# Altium PCB ResearchProject_V5.PcbDoc (part 2 of 2)
Units mm, origin at the board's own origin, x right, y up, seen from the top; angles counter-clockwise.
Board outline 152.49 x 130.17 mm, 4 copper layers (Top Layer, GND, 3V3, Bottom Layer), stack 0.603 mm thick; 150 components, 186 nets, 766 pads, 209 vias.
Unrouted connection lines stored in the file: 6.
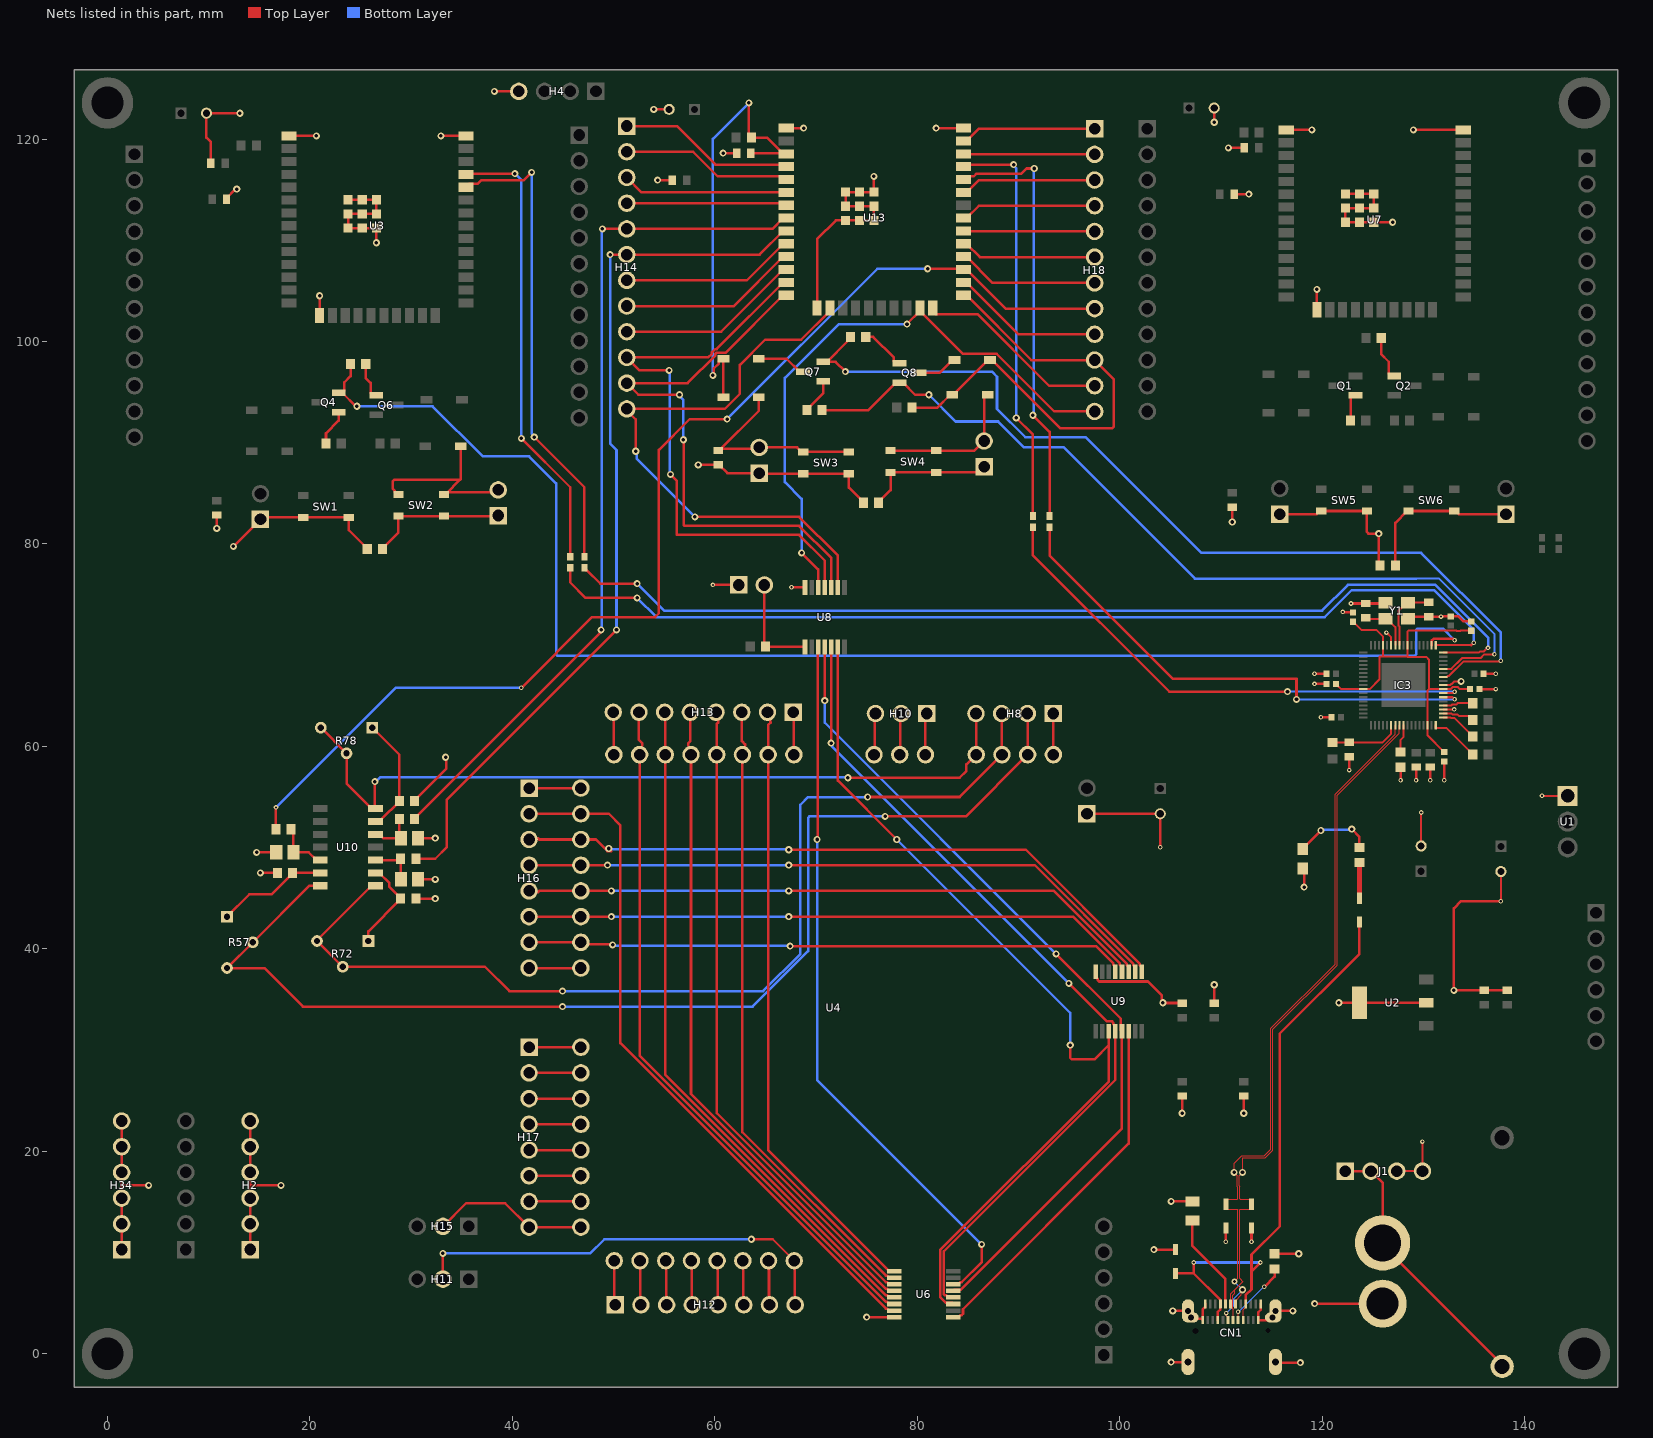
[diagram p4: the nets of this part, all layers, seen from the top]

## Via types
v1: diameter 0.7, hole 0.35, Top Layer to Bottom Layer, tented both sides, 161 vias
v2: diameter 0.45, hole 0.225, Top Layer to Bottom Layer, tented both sides, 45 vias
v3: diameter 0.45, hole 0.225, Top Layer to Bottom Layer, 1 vias
v4: diameter 0.7, hole 0.225, Top Layer to Bottom Layer, tented both sides, 1 vias
v5: diameter 0.6, hole 0.3, Top Layer to Bottom Layer, tented both sides, 1 vias

## Nets (pads, with @x,y where several pads share a name; then routed paths per layer and width w, separated by ;. In a path a pad name is that pad's centre, name@x,y a point inside that pad or via, vN(x,y) a via of type N, cw(c..) or ccw(c..) an arc to the next point about the centre after c; other vN are vias at no path point) (continued)
CLIENT_IO0_KEY: D16.1 H20.2 SW2.3 SW2.4 | length 19.5
  Top Layer w0.25: SW2.4@28.738,84.895 28.588,84.895 28.363,85.12 28.363,85.27 28.194,85.439 28.194,86.214 28.34,86.36 34.853,86.36 34.897,86.404 ; D16.1@34.897,89.662 34.897,86.404 ; H20.2@38.608,85.344 38.383,85.119 33.463,85.119 SW2.3@33.238,84.895 33.388,84.895 34.897,86.404
CLIENT_RTS: IC3.19 Q4.2 R51.1 | length 140
  Top Layer w0.25: Q4.2@22.844,94.94 Q4.2@23.194,94.94 ; R51.1@24.015,97.79 24.015,96.588 23.394,95.967 23.394,95.14 Q4.2@23.194,94.94 ; v1(24.638,93.599) 24.535,93.599 Q4.2@23.194,94.94 ; IC3.19@130.835,70.003 130.86,70.028 130.86,70.473 131.041,70.655 132.872,70.655 133.042,70.485 v2(133.096,70.485)
  Bottom Layer w0.25: v1(24.638,93.599) 32.131,93.599 37.084,88.646 41.656,88.646 44.323,85.979 44.323,69.087 44.469,68.94 129.14,68.94 129.286,69.087 129.286,71.482 129.432,71.628 131.953,71.628 v2(133.096,70.485)
CLIENT_RXD: IC3.18 R19.1 | length 100
  Top Layer w0.2: IC3.18@131.235,70.003 134.719,70.003
  Top Layer w0.25: R19.1@45.72,77.64 45.72,76.2 47.244,74.676 v1(52.324,74.676) ; 134.719,70.003 134.947,70.231 v2(135.001,70.231)
  Bottom Layer w0.25: v1(52.324,74.676) 54.229,72.771 120.269,72.771 122.936,75.438 131.064,75.438 135.001,71.501 v2(135.001,70.231)
CLIENT_TXD: IC3.17 R18.1 | length 99.9
  Top Layer w0.2: IC3.17@131.985,69.253 135.479,69.253 135.619,69.392 136,69.392 136.33,69.723 v2(136.398,69.723)
  Top Layer w0.25: R18.1@47.117,77.64 47.117,77.565 47.292,77.39 47.367,77.39 48.684,76.073 v1(52.324,76.073)
  Bottom Layer w0.25: v1(52.324,76.073) 54.991,73.406 120.015,73.406 122.555,75.946 131.191,75.946 136.398,70.739 v2(136.398,69.723)
CLIENT_U0RXD: R18.2 U3.34 | length 47.2
  Top Layer w0.25: U3.34@35.42,115.242 35.745,115.567 36.573,115.567 36.957,115.951 41.148,115.951 v1(41.91,116.713) ; v1(42.164,90.551) 47.117,85.598 R18.2@47.117,78.74
  Bottom Layer w0.25: v1(41.91,116.713) 41.91,90.927 42.164,90.673 v1(42.164,90.551)
CLIENT_U0TXD: R19.2 U3.35 | length 45
  Top Layer w0.25: U3.35@35.42,116.512 35.494,116.586 v1(40.259,116.586) ; v1(40.894,90.424) 45.72,85.598 R19.2@45.72,78.74
  Bottom Layer w0.25: v1(40.259,116.586) 40.894,115.951 v1(40.894,90.424)
GND: C1.2 C2.2 C3.2 C4.2 C5.2 C6.2 C7.2 C8.2 C9.2 C10.2 C11.2 C12.1 C16.2 C17.2 C25.2 C26.2 C27.2 C28.2 C29.2 C32.2 C35.1 C36.2 C37.2 C38.2 C39.2 C43.2 C45.1 C46.2 C49.2 C50.2 C51.2 C52.2 C59.2 C60.2 C61.2 C62.2 C63.2 C64.2 CN1.1 CN1.2 CN1.3 CN1.4 CN1.A1 CN1.A12 CN1.B1 CN1.B12 D8.1 D9.1 D10.1 D13.1 H2.1 H2.2 H2.3 H2.4 H2.5 H2.6 H4.4 H6.1 H19.1 H21.1 H22.1 H34.1 H34.2 H34.3 H34.4 H34.5 H34.6 IC3.3 IC3.9 IC3.29 J1.3 J1.4 J2.2 R5.2 R38.2 R50.2 R56.1 R65.2 R70.1 R77.1 R81.2 R88.2 SW1.1 SW1.2 SW3.1 SW3.2 SW5.1 SW5.2 U1.1 U2.2 U2.4 U3.1 U3.15 U3.38 U3.39 U3.40 U3.41 U3.42 U3.43 U3.44 U3.45 U3.46 U3.47 U4.1 U6.8 U7.1 U7.15 U7.38 U7.39 U7.40 U7.41 U7.42 U7.43 U7.44 U7.45 U7.46 U7.47 U8.7 U9.8 U13.1 U13.15 U13.38 U13.39 U13.40 U13.41 U13.42 U13.43 U13.44 U13.45 U13.46 U13.47 Y1.2 Y1.4 | length 325
  Top Layer w0.2: v2(126.365,71.247) 126.835,70.777 IC3.29@126.835,70.003 ; J1.3@127.381,18.034 J1.4@129.921,18.034 v3(129.921,20.955) ; C3.2@129.794,50.165 v2(129.794,53.467) ; IC3.3@131.985,63.653 v2(133.07,63.653) ; IC3.9@131.985,66.053 132.663,66.053 132.78,66.169 132.836,66.169 133.088,66.421 v1(133.731,66.421) ; v2(137.668,44.704) C2.2@137.668,47.625 ; v2(141.732,55.118) U1.1@144.272,55.118
  Top Layer w0.25: H34.1@1.397,10.287 H34.2@1.397,12.827 H34.3@1.397,15.367 1.397,16.625 ; H34.4@1.397,17.895 1.397,16.625 ; H34.4@1.397,17.907 H34.5@1.397,20.447 H34.6@1.397,22.987 ; v1(4.064,16.625) 1.397,16.625 ; C16.2@10.212,117.602 10.212,119.718 9.779,120.151 C8.2@9.779,122.555 v1(13.081,122.555) ; v1(10.795,81.534) C35.1@10.795,82.856 ; C9.2@11.759,114.046 11.759,114.151 12.67,115.062 v1(12.775,115.062) ; v1(12.446,79.756) H19.1@15.113,82.423 15.308,82.618 SW1.2@19.34,82.618 SW1.1@23.84,82.618 23.84,81.378 25.666,79.552 R50.2@25.666,79.502 ; H2.1@14.097,10.287 H2.2@14.097,12.827 H2.3@14.097,15.367 14.097,16.625 ; H2.4@14.097,17.895 14.097,16.625 ; H2.4@14.097,17.907 H2.5@14.097,20.447 H2.6@14.097,22.987 ; v1(14.732,49.53) C43.2@16.676,49.53 ; v1(15.113,47.498) R56.1@16.788,47.498 ; v1(17.145,16.625) 14.097,16.625 ; U3.1@17.92,120.322 v1(20.648,120.322) ; U3.15@20.955,102.562 v1(20.955,104.521) ; U3.39@23.77,114.002 U3.46@25.17,114.002 U3.45@26.57,114.002 U3.44@26.57,112.602 U3.47@25.17,112.602 U3.40@23.77,112.602 U3.41@23.77,111.202 U3.42@25.17,111.202 U3.43@26.57,111.202 v1(26.57,109.755) ; R77.1@30.341,54.61 30.341,54.66 33.466,57.785 33.466,58.863 v1(33.401,58.928) ; R70.1@30.468,44.958 v1(32.385,44.958) ; C46.2@30.695,46.863 v1(32.385,46.863) ; C49.2@30.695,50.927 v1(32.385,50.927) ; v1(32.946,120.322) U3.38@35.42,120.322 ; v1(38.227,124.714) H4.4@40.64,124.714 ; v1(53.975,122.936) C50.2@55.499,122.936 ; v1(54.356,115.951) C51.2@55.805,115.951 ; v1(58.368,87.809) C45.1@60.325,87.809 ; v2(59.817,75.946) H21.1@62.357,75.946 ; C45.1@60.43,87.809 61.244,86.995 H22.1@64.389,86.995 64.448,86.936 SW3.2@68.743,86.936 SW3.1@73.243,86.936 73.243,85.569 74.688,84.124 R65.2@74.688,84.074 ; v1(60.833,118.618) C52.2@62.155,118.618 ; U13.1@67.069,121.084 v1(68.781,121.084) ; v2(67.581,75.709) U8.7@68.916,75.709 ; U13.15@70.104,103.324 70.104,110.109 71.959,111.964 U13.41@72.919,111.964 U13.42@74.319,111.964 U13.43@75.719,111.964 U13.44@75.719,113.364 U13.47@74.319,113.364 U13.40@72.919,113.364 U13.39@72.919,114.764 U13.46@74.319,114.764 U13.45@75.719,114.764 v1(75.719,116.305) ; v1(75.005,3.608) U6.8@77.724,3.608 ; v1(81.862,121.084) U13.38@84.569,121.084 ; U4.1@96.774,53.339 C17.2@104.013,53.34 v2(104.013,50.038) ; U9.8@97.633,37.719 97.633,37.219 97.831,37.021 97.831,36.9 97.964,36.767 102.806,36.767 104.181,35.392 104.181,34.757 v1(104.267,34.671) 104.293,34.645 106.146,34.645 C32.2@106.172,34.619 ; v1(103.378,10.287) D10.1@105.537,10.287 ; v1(105.09,15.047) R88.2@107.188,15.047 ; v1(105.096,-0.829) CN1.3@106.761,-0.829 ; v1(105.253,4.221) CN1.1@106.761,4.221 ; v1(106.172,23.749) C7.2@106.172,25.452 ; CN1.1@107.061,3.571 107.186,3.446 108.196,3.446 108.206,3.436 CN1.B12@108.206,3.321 108.206,4.356 108.456,4.606 CN1.A1@108.456,4.921 ; C37.2@109.347,34.619 v1(109.347,36.449) ; v1(109.347,121.666) C1.2@109.347,123.063 ; v2(110.49,11.049) D9.1@110.49,12.414 ; v1(110.744,119.126) C10.2@112.32,119.126 ; v1(111.125,82.169) C12.1@111.125,83.618 ; C11.2@111.327,114.554 v1(112.776,114.554) ; v1(112.268,23.749) C5.2@112.268,25.452 ; v2(113.03,11.049) D8.1@113.03,12.414 ; CN1.A12@113.956,4.921 113.946,4.911 113.946,4.336 113.706,4.096 CN1.B1@113.706,3.321 114.794,3.321 115.401,3.928 CN1.2@115.401,4.221 v1(117.124,4.221) ; R81.2@115.316,9.875 v1(117.698,9.875) ; CN1.4@115.401,-0.829 115.461,-0.889 v1(117.856,-0.889) ; H6.1@115.824,82.931 119.452,82.931 119.774,83.253 SW5.2@119.924,83.253 SW5.1@124.424,83.253 124.424,81.189 124.587,81.026 v1(125.603,81.026) 125.603,77.99 R5.2@125.742,77.851 ; U7.1@116.459,120.904 v1(118.999,120.904) ; D13.1@118.11,47.945 118.237,47.818 v1(118.237,46.101) ; v2(119.253,66.167) C64.2@120.444,66.167 ; v2(119.253,67.183) C27.2@120.444,67.183 ; v1(119.266,4.94) J2.2@125.984,4.94 ; U7.15@119.494,103.144 v1(119.494,105.143) ; v2(119.888,62.865) C28.2@120.952,62.865 ; v1(121.666,34.671) U2.4@123.7,34.671 U2.2@130.3,34.671 ; v2(122.047,73.279) 122.095,73.231 C36.2@123.063,73.231 ; U7.39@122.309,114.584 U7.46@123.709,114.584 U7.45@125.109,114.584 U7.44@125.109,113.184 U7.47@123.709,113.184 U7.40@122.309,113.184 U7.41@122.309,111.784 U7.42@123.709,111.784 U7.43@125.109,111.784 v1(126.976,111.784) ; v2(122.682,57.658) C25.2@122.682,58.98 ; v2(122.861,74.116) C60.2@124.333,74.116 126.191,74.116 Y1.2@126.281,74.206 ; v2(127.762,56.642) R38.2@127.762,57.936 ; Y1.4@128.481,72.606 128.698,72.823 C59.2@130.556,72.823 v2(131.751,72.823) 131.764,72.836 132.701,72.836 C26.2@132.715,72.85 133.467,72.85 133.975,72.342 C63.2@134.747,72.342 ; v1(129.032,120.904) U7.38@133.959,120.904 ; v2(129.286,56.642) C39.2@129.286,57.964 ; v2(130.683,56.642) C38.2@130.683,57.964 ; v2(132.08,56.642) C61.2@132.08,58.516 ; C62.2@135.54,65.659 v2(137.16,65.659) ; C29.2@135.969,67.183 v2(137.16,67.183) ; v2(137.668,44.704) 133.731,44.704 133.021,43.994 v1(133.021,35.889) C4.2@136.017,35.889 C6.2@138.303,35.889
NetC25_1: C25.1 FB2.2 IC3.57 | length 7
  Top Layer w0.2: FB2.2@121.031,60.363 121.068,60.4 C25.1@122.682,60.4 125.983,60.4 126.835,61.252 IC3.57@126.835,62.103
NetC43_1: C43.1 R54.2 U10.5 | length 5.3
  Top Layer w0.25: R54.2@18.149,51.816 18.376,51.589 C43.1@18.376,49.53 19.887,49.53 20.649,48.768 U10.5@21.03,48.768
NetC46_1: C46.1 R68.2 U10.10 | length 4.6
  Top Layer w0.25: U10.10@26.468,48.768 28.841,48.768 R68.2@28.968,48.895 28.995,48.868 C46.1@28.995,46.863
NetC49_1: C49.1 R75.2 U10.12 | length 4.7
  Top Layer w0.25: U10.12@26.468,51.308 26.849,51.308 27.23,50.927 C49.1@28.995,50.927 28.841,51.081 R75.2@28.841,52.832
NetC59_1: C59.1 IC3.27 Y1.1 | length 6.8
  Top Layer w0.2: IC3.27@127.635,70.003 127.635,71.857 127.554,71.937 127.554,73.404 128.356,74.206 Y1.1@128.481,74.206 130.519,74.206 C59.1@130.556,74.243
NetC60_1: C60.1 IC3.28 Y1.3 | length 5.1
  Top Layer w0.2: C60.1@124.333,72.696 124.423,72.606 Y1.3@126.281,72.606 126.406,72.606 127.235,71.777 IC3.28@127.235,70.003
NetCN1_A4: CN1.A4 CN1.A9 CN1.B4 CN1.B9 D6.2 D10.2 | length 60.6
  Top Layer w0.1: CN1.B4@112.206,3.321 112.206,4.356 112.456,4.606 CN1.A9@112.456,4.921
  Top Layer w0.25: D10.2@105.537,7.937 107.326,7.937 ; v2(107.326,9.006) 107.326,7.937 ; CN1.B9@109.706,3.321 109.706,4.141 109.946,4.381 109.946,4.911 CN1.A4@109.956,4.921 109.946,4.931 109.946,5.317 107.326,7.937 ; CN1.A9@112.456,4.921 112.456,5.781 113.03,6.355 113.03,8.067 ; v2(113.908,9.006) 113.03,8.128 113.03,8.067 ; D6.2@123.698,42.64 123.698,39.497 115.824,31.623 115.824,12.573 113.03,9.779 113.03,8.067
  Bottom Layer w0.25: v2(107.326,9.006) v2(113.908,9.006)
NetCN1_A5: CN1.A5 R88.1 | length 9.6
  Top Layer w0.25: R88.1@107.188,13.147 107.188,10.638 110.456,7.37 CN1.A5@110.456,4.921
NetCN1_B5: CN1.B5 R81.1 | length 6.6
  Top Layer w0.1: CN1.B5@111.706,3.321 v2(111.706,4.137)
  Top Layer w0.25: v2(114.3,6.604) 115.316,7.62 R81.1@115.316,8.374
  Bottom Layer w0.1: v2(111.706,4.137) 111.77,4.137 114.236,6.604 v2(114.3,6.604)
NetD13_2: D13.2 R44.1 | length 7.8
  Top Layer w0.25: D13.2@118.11,49.845 118.11,49.92 119.879,51.689 v1(119.888,51.689) ; v1(122.936,51.816) 123.698,51.054 R44.1@123.698,50.014
  Bottom Layer w0.25: v1(119.888,51.689) 119.951,51.752 122.872,51.752 v1(122.936,51.816)
NetF1_1: F1.1 J1.1 J1.2 J2.1 | length 27.2
  Top Layer w0.25: J1.1@122.301,18.034 J1.2@124.841,18.034 125.984,16.891 J2.1@125.984,10.94 125.984,10.744 137.795,-1.067 F1.1@137.795,-1.264
NetH20_1: H20.1 R50.1 SW2.1 SW2.2 | length 13.8
  Top Layer w0.25: R50.1@27.166,79.502 27.166,79.552 28.738,81.124 SW2.2@28.738,82.745 SW2.1@33.238,82.745 38.549,82.745 H20.1@38.608,82.804
NetH21_2: H21.2 R48.1 U8.8 | length 10.1
  Top Layer w0.25: H21.2@64.897,75.946 64.897,69.965 R48.1@65.012,69.85 68.899,69.85 U8.8@68.916,69.833
NetH23_1: H23.1 R65.1 SW4.1 SW4.2 | length 13
  Top Layer w0.25: R65.1@76.188,84.074 76.188,84.124 77.379,85.315 SW4.2@77.379,87.063 SW4.1@81.879,87.063 86.047,87.063 H23.1@86.614,87.63
NetH24_1: H24.1 R5.1 SW6.1 SW6.2 | length 15.8
  Top Layer w0.25: R5.1@127.242,77.851 127.242,82.085 128.41,83.253 SW6.2@128.56,83.253 SW6.1@133.06,83.253 133.21,83.253 133.532,82.931 H24.1@138.176,82.931
NetIC3_1: IC3.1 R42.2 | length 3.7
  Top Layer w0.2: IC3.1@131.985,62.853 132.683,62.853 132.722,62.814 133.061,62.814 134.54,61.335 134.561,61.335 134.886,61.01 R42.2@134.886,60.96
NetIC3_2: IC3.2 R40.2 | length 3.2
  Top Layer w0.2: IC3.2@131.985,63.253 132.781,63.253 132.868,63.165 133.377,63.165 133.556,62.986 134.561,62.986 134.886,62.661 R40.2@134.886,62.611
NetIC3_4: IC3.4 R33.1 | length 3
  Top Layer w0.2: IC3.4@131.985,64.053 132.781,64.053 132.883,64.156 133.298,64.156 133.404,64.262 R33.1@134.886,64.262
NetIC3_60: IC3.60 R38.1 | length 2.8
  Top Layer w0.2: R38.1@127.762,59.436 127.762,60.646 128.035,60.919 IC3.60@128.035,62.103
NetIC3_68: IC3.68 R45.1 | length 5.1
  Top Layer w0.2: IC3.68@131.235,62.103 131.235,61.828 131.26,61.803 132.315,61.803 134.886,59.232 R45.1@134.886,59.182
NetQ1_1: Q1.1 R2.2 | length 2.8
  Top Layer w0.25: R2.2@122.821,92.202 122.821,94.471 123.021,94.671 Q1.1@123.301,94.671
NetQ2_1: Q2.1 R3.2 | length 4.5
  Top Layer w0.25: R3.2@125.845,100.33 125.845,98.747 126.593,97.999 126.593,96.791 126.793,96.591 Q2.1@127.143,96.591
NetQ4_1: Q4.1 R47.2 | length 3.6
  Top Layer w0.25: R47.2@21.602,89.916 21.59,89.928 21.59,90.932 22.844,92.186 Q4.1@22.844,93.02
NetQ6_1: Q6.1 R51.2 | length 3.7
  Top Layer w0.25: R51.2@25.515,97.79 25.515,96.398 26.009,95.904 26.009,94.886 26.209,94.686 Q6.1@26.559,94.686
NetQ7_1: Q7.1 R59.2 | length 3.5
  Top Layer w0.25: R59.2@69.1,93.218 69.1,93.268 70.723,94.891 Q7.1@70.723,96.068
NetQ8_1: Q8.1 R69.2 | length 4.6
  Top Layer w0.25: R69.2@74.918,100.457 75.652,100.457 77.698,98.411 77.698,98.061 77.898,97.861 Q8.1@78.248,97.861
NetR56_2: R56.2 R57.1 U10.6 | length 11
  Top Layer w0.25: R57.1@11.811,43.18 14.009,45.378 16.218,45.378 18.288,47.448 R56.2@18.288,47.498 U10.6@21.03,47.498
NetR70_2: R70.2 R72.1 U10.9 | length 9.3
  Top Layer w0.25: R72.1@25.781,40.767 25.781,41.721 28.968,44.908 28.968,45.008 27.859,46.117 27.859,46.488 26.849,47.498 U10.9@26.468,47.498
NetR77_2: R77.2 R78.1 U10.13 | length 11.6
  Top Layer w0.25: R78.1@26.162,61.849 28.841,59.17 28.841,54.56 27.084,52.803 26.693,52.803 U10.13@26.468,52.578
NetU6_9: U6.9 U9.14 | length 35.8
  Top Layer w0.25: U6.9@83.574,3.608 84.074,3.608 84.272,3.806 84.393,3.806 84.526,3.939 84.526,4.389 100.883,20.746 U9.14@100.883,31.869
PLC_A_1: H8.2 R57.2 R57.3 U4.4 U10.7 | length 115.4
  Top Layer w0.25: U10.7@21.03,46.228 21.015,46.213 19.924,46.213 R57.2@14.351,40.64 R57.3@11.811,38.1 15.494,38.1 19.304,34.29 v1(44.958,34.29) ; v1(76.835,53.086) 84.821,53.086 U4.4@90.914,59.179 90.901,59.192 90.901,63.232 H8.2@90.888,63.245
  Bottom Layer w0.25: v1(44.958,34.29) 63.743,34.29 69.215,39.762 69.215,52.94 69.361,53.086 v1(76.835,53.086)
PLC_A_2: H8.3 R72.2 R72.3 U4.5 U10.8 | length 100.2
  Top Layer w0.25: U10.8@26.468,46.228 26.087,46.228 20.701,40.842 R72.3@20.701,40.767 R72.2@23.241,38.227 37.297,38.227 39.71,35.814 v1(44.958,35.814) ; v1(75.094,54.998) 84.192,54.998 U4.5@88.374,59.179 88.361,59.192 88.361,63.232 H8.3@88.348,63.245
  Bottom Layer w0.25: v1(44.958,35.814) 64.77,35.814 68.453,39.497 68.453,54.229 69.215,54.991 75.087,54.991 v1(75.094,54.998)
PLC_A_3: H8.4 R78.2 R78.3 U4.6 U10.14 | length 78.2
  Top Layer w0.25: R78.3@21.082,61.849 R78.2@23.622,59.309 23.622,56.313 26.087,53.848 U10.14@26.468,53.848 26.416,53.9 v1(26.416,56.515) ; v1(73.152,56.896) 84.182,56.896 84.867,57.581 84.867,58.212 U4.6@85.834,59.179 85.821,59.192 85.821,63.232 H8.4@85.808,63.245
  Bottom Layer w0.25: v1(26.416,56.515) 26.534,56.515 26.988,56.968 73.08,56.968 v1(73.152,56.896)
PLC_A_GND: H8.1 U4.3 | length 4.1
  Top Layer w0.25: H8.1@93.428,63.245 93.454,63.219 U4.3@93.454,59.179
PLC_A_RS_GND: H10.3 U4.9 | length 4.1
  Top Layer w0.25: U4.9@75.734,59.179 75.806,59.252 75.806,63.173 H10.3@75.879,63.245
PLC_A_RS_RX: H10.1 U4.7 | length 4.1
  Top Layer w0.25: U4.7@80.814,59.179 80.814,63.1 H10.1@80.959,63.245
PLC_A_RS_TX: H10.2 U4.8 | length 4.1
  Top Layer w0.25: U4.8@78.274,59.179 78.346,59.252 78.346,63.173 H10.2@78.419,63.245
PLC_B_1: H13.2 U4.11 U6.1 | length 60.9
  Top Layer w0.25: H13.2@65.211,63.372 65.493,63.09 65.493,62.396 65.532,62.357 65.274,62.099 U4.11@65.274,59.179 65.274,20.108 77.224,8.158 U6.1@77.724,8.158
PLC_B_2: H13.3 U4.12 U6.2 | length 61.7
  Top Layer w0.25: H13.3@62.671,63.372 62.671,60.519 62.992,60.198 62.992,60.071 ; U4.12@62.734,59.179 62.734,21.878 76.905,7.706 77.026,7.706 77.224,7.508 U6.2@77.724,7.508
PLC_B_3: H13.4 U4.13 U6.3 | length 64.3
  Top Layer w0.25: H13.4@60.131,63.372 60.325,63.178 60.325,62.357 60.194,62.226 U4.13@60.194,59.179 60.194,23.768 76.905,7.056 77.026,7.056 77.224,6.858 U6.3@77.724,6.858
PLC_B_4: H13.5 U4.14 U6.4 | length 65
  Top Layer w0.25: 57.404,60.071 57.404,60.325 57.591,60.512 H13.5@57.591,63.372 ; U4.14@57.654,59.179 57.654,25.658 76.905,6.406 77.026,6.406 77.224,6.208 U6.4@77.724,6.208
PLC_B_5: H13.6 U4.15 U6.5 | length 67.6
  Top Layer w0.25: H13.6@55.051,63.372 55.114,63.309 55.114,62.48 ; 55.118,62.484 55.114,62.48 ; U6.5@77.724,5.558 77.224,5.558 77.026,5.756 76.905,5.756 55.114,27.548 U4.15@55.114,59.179 55.114,62.48
PLC_B_6: H13.7 U4.16 U6.6 | length 68.5
  Top Layer w0.25: H13.7@52.511,63.372 52.511,60.646 52.855,60.302 52.855,60.094 52.832,60.071 ; U4.16@52.574,59.179 52.574,29.438 76.905,5.106 77.026,5.106 77.224,4.908 U6.6@77.724,4.908
PLC_B_GND: H13.1 U4.10 | length 4.2
  Top Layer w0.25: H13.1@67.751,63.372 67.814,63.309 U4.10@67.814,59.179
PLC_B_VI: H13.8 U4.17 | length 4.2
  Top Layer w0.25: H13.8@49.971,63.372 50.002,63.341 50.002,59.211 U4.17@50.034,59.179
PLC_C_1: H16.2 U4.19 U6.7 | length 69
  Top Layer w0.25: H16.2@41.656,53.339 42.799,53.34 U4.19@46.774,53.339 49.531,53.339 50.673,52.197 50.673,30.689 76.905,4.456 77.026,4.456 77.224,4.258 U6.7@77.724,4.258
PLC_C_2: H16.3 U4.20 U9.1 | length 65.8
  Top Layer w0.25: 42.545,50.927 42.673,50.799 U4.20@46.774,50.799 48.261,50.799 49.403,49.657 49.784,49.657 ; v1(67.31,49.784) 90.738,49.784 101.985,38.538 101.985,38.417 102.183,38.219 U9.1@102.183,37.719
  Bottom Layer w0.25: v1(49.53,49.911) 49.593,49.847 67.246,49.847 v1(67.31,49.784)
PLC_C_3: H16.4 U4.21 U9.2 | length 64.6
  Top Layer w0.25: H16.4@41.656,48.259 47.752,48.259 v1(49.403,48.26) ; v1(67.31,48.26) 91.612,48.26 101.335,38.538 101.335,38.417 101.533,38.219 U9.2@101.533,37.719
  Bottom Layer w0.25: v1(49.403,48.26) v1(67.31,48.26)
PLC_C_4: H16.5 U4.22 U9.3 | length 62.1
  Top Layer w0.25: 42.545,45.593 42.671,45.719 U4.22@46.774,45.719 v1(49.784,45.72) ; v1(67.31,45.72) 93.502,45.72 100.685,38.538 100.685,38.417 100.883,38.219 U9.3@100.883,37.719
  Bottom Layer w0.25: v1(49.784,45.72) v1(67.31,45.72)
PLC_C_5: H16.6 U4.23 U9.4 | length 61.2
  Top Layer w0.25: H16.6@41.656,43.179 U4.23@46.774,43.179 v1(49.784,43.18) ; v1(67.31,43.18) 95.392,43.18 100.035,38.538 100.035,38.417 100.233,38.219 U9.4@100.233,37.719
  Bottom Layer w0.25: v1(49.784,43.18) v1(67.31,43.18)
PLC_C_6: H16.7 U4.24 U9.5 | length 59.5
  Top Layer w0.25: H16.7@41.656,40.639 42.926,40.64 U4.24@46.774,40.639 46.941,40.472 49.825,40.472 v1(49.911,40.386) ; v1(67.437,40.259) 97.663,40.259 99.385,38.538 99.385,38.417 99.583,38.219 U9.5@99.583,37.719
  Bottom Layer w0.25: v1(49.911,40.386) 49.974,40.322 67.373,40.322 v1(67.437,40.259)
PLC_C_GND: H16.1 U4.18 | length 5.1
  Top Layer w0.25: H16.1@41.656,55.879 U4.18@46.774,55.879
PLC_C_VI2: H16.8 U4.25 | length 5.1
  Top Layer w0.25: H16.8@41.656,38.099 U4.25@46.774,38.099
PLC_D_1: H17.2 U4.27 | length 5.1
  Top Layer w0.25: H17.2@41.656,27.739 U4.27@46.774,27.739
PLC_D_2: H17.3 U4.28 | length 5.1
  Top Layer w0.25: H17.3@41.656,25.199 U4.28@46.774,25.199
PLC_D_3: H17.4 U4.29 | length 5.1
  Top Layer w0.25: H17.4@41.656,22.659 U4.29@46.774,22.659
PLC_D_4: H17.5 U4.30 | length 5.1
  Top Layer w0.25: H17.5@41.656,20.119 U4.30@46.774,20.119
PLC_D_5: H17.6 U4.31 | length 5.1
  Top Layer w0.25: H17.6@41.656,17.579 U4.31@46.774,17.579
PLC_D_6: H17.7 U4.32 | length 5.1
  Top Layer w0.25: H17.7@41.656,15.039 U4.32@46.774,15.039
PLC_D_GND: H17.1 U4.26 | length 5.1
  Top Layer w0.25: H17.1@41.656,30.279 U4.26@46.774,30.279
PLC_D_VO1: H15.2 H17.8 U4.33 | length 15.6
  Top Layer w0.25: H15.2@33.147,12.573 35.433,14.859 39.296,14.859 H17.8@41.656,12.499 U4.33@46.774,12.499
PLC_DS: U6.14 U8.10 | length 71.3
  Top Layer w0.25: v1(70.104,50.8) 70.16,50.856 70.16,69.777 U8.10@70.216,69.833 ; U6.14@83.574,6.858 84.074,6.858 84.272,7.056 84.393,7.056 86.36,9.024 v1(86.36,10.795)
  Bottom Layer w0.25: v1(70.104,50.8) 70.104,27.051 v1(86.36,10.795)
PLC_E_1: H12.2 U4.35 | length 4.4
  Top Layer w0.25: U4.35@52.614,9.179 52.66,9.134 52.66,4.871 H12.2@52.705,4.826
PLC_E_2: H12.3 U4.36 | length 4.4
  Top Layer w0.25: U4.36@55.154,9.179 55.2,9.134 55.2,4.871 H12.3@55.245,4.826
PLC_E_3: H12.4 U4.37 | length 4.4
  Top Layer w0.25: U4.37@57.694,9.179 57.74,9.134 57.74,4.871 H12.4@57.785,4.826
PLC_E_4: H12.5 U4.38 | length 4.4
  Top Layer w0.25: U4.38@60.234,9.179 60.28,9.134 60.28,4.871 H12.5@60.325,4.826
PLC_E_5: H12.6 U4.39 | length 4.4
  Top Layer w0.25: U4.39@62.774,9.179 62.82,9.134 62.82,4.871 H12.6@62.865,4.826
PLC_E_6: H12.7 U4.40 | length 4.4
  Top Layer w0.25: U4.40@65.314,9.179 65.36,9.134 65.36,4.871 H12.7@65.405,4.826
PLC_E_GND: H12.1 U4.34 | length 4.4
  Top Layer w0.25: U4.34@50.074,9.179 50.074,4.917 H12.1@50.165,4.826
PLC_E_VO2: H11.2 H12.8 U4.41 | length 43.1
  Top Layer w0.25: H11.2@33.147,7.366 v1(33.147,9.906) ; v1(63.627,11.303) 65.73,11.303 U4.41@67.854,9.179 67.9,9.134 67.9,4.871 H12.8@67.945,4.826
  Bottom Layer w0.25: v1(33.147,9.906) 47.688,9.906 49.085,11.303 v1(63.627,11.303)
PLC_OE: U6.13 U8.11 U9.13 | length 83.1
  Top Layer w0.25: v1(70.866,64.516) U8.11@70.866,69.833 ; U6.13@83.574,6.208 83.674,6.308 84.294,6.308 100.233,22.247 U9.13@100.233,31.869 100.133,31.969 100.133,33.09 v1(93.726,39.497)
  Bottom Layer w0.25: v1(70.866,64.516) 70.866,62.357 v1(93.726,39.497)
PLC_SH_CP: U6.11 U8.13 U9.11 | length 89.1
  Top Layer w0.25: U8.13@72.166,69.833 72.166,56.612 v1(77.978,50.8) ; U6.11@83.574,4.908 83.474,5.008 82.854,5.008 82.271,5.591 82.271,10.244 98.933,26.907 98.933,30.518 ; v1(95.123,30.48) 95.123,29.229 95.269,29.083 97.498,29.083 98.933,30.518 ; U9.11@98.933,31.619 98.933,30.518
  Bottom Layer w0.25: v1(77.978,50.8) 95.123,33.655 v1(95.123,30.48)
PLC_ST_CP: U6.12 U8.12 U9.12 | length 84
  Top Layer w0.25: v1(71.501,60.325) 71.509,60.333 71.509,69.825 U8.12@71.516,69.833 ; U6.12@83.574,5.558 83.074,5.558 82.876,5.756 82.755,5.756 82.622,5.889 82.622,10.099 99.583,27.059 U9.12@99.583,31.869 99.583,32.369 99.385,32.567 99.385,32.688 99.252,32.821 98.751,32.821 v1(94.996,36.576)
  Bottom Layer w0.25: v1(71.501,60.325) 71.587,60.239 71.587,59.985 v1(94.996,36.576)
SERVER_DTR: IC3.13 Q8.2 R59.1 | length 85.5
  Top Layer w0.2: IC3.13@131.985,67.653 132.769,67.653 133.825,68.709 135.657,68.709 136.036,69.088 v2(137.033,69.088)
  Top Layer w0.25: R59.1@70.6,93.218 75.175,93.218 77.898,95.941 Q8.2@78.248,95.941 78.598,95.941 79.797,94.742 v1(81.153,94.742)
  Bottom Layer w0.2: 129.286,76.581 131.572,76.581 137.033,71.12 v2(137.033,69.088)
  Bottom Layer w0.25: v1(81.153,94.742) 83.8,92.095 87.991,92.095 90.551,89.535 94.488,89.535 107.442,76.581 129.286,76.581
SERVER_EN: C52.1 D18.2 D19.2 R102.2 U13.3 | length 45.1
  Top Layer w0.25: v1(59.817,96.647) 59.903,96.733 59.903,97.34 60.411,97.848 60.411,98.048 60.661,98.298 D19.2@60.861,98.298 D18.2@60.861,94.488 ; v1(63.373,123.571) 63.373,120.384 R102.2@63.615,120.142 65.171,120.142 U13.3@66.695,118.618 ; C52.1@63.575,118.618 U13.3@66.695,118.618 ; U13.3@66.995,118.618 U13.3@66.695,118.618
  Bottom Layer w0.25: v1(59.817,96.647) 59.817,120.015 v1(63.373,123.571)
SERVER_EN_AUTO: D19.1 Q7.3 | length 4.9
  Top Layer w0.25: D19.1@64.361,98.298 67.103,98.298 68.373,97.028 Q7.3@68.723,97.028
SERVER_EN_KEY: C45.2 D18.1 H22.2 SW3.3 SW3.4 | length 20.1
  Top Layer w0.25: C45.2@60.325,89.229 60.478,89.382 64.236,89.382 H22.2@64.389,89.535 68.144,89.535 68.593,89.086 SW3.4@68.743,89.086 SW3.3@73.243,89.086 ; C45.2@60.43,89.229 64.361,93.16 D18.1@64.361,94.488
SERVER_GPIO0: D20.2 D21.2 H18.10 R64.1 U13.25 | length 47.8
  Top Layer w0.25: R64.1@79.478,93.472 81.997,93.472 83.267,94.742 83.667,94.742 83.917,94.992 83.917,95.095 86.993,98.171 D21.2@87.193,98.171 87.393,98.171 94.124,91.44 99.295,91.44 99.441,91.586 99.441,96.266 H18.10@97.536,98.171 91.272,98.171 84.869,104.574 U13.25@84.569,104.574
SERVER_GPIO2: H18.11 U13.24 | length 19.4
  Top Layer w0.25: U13.24@81.534,103.324 81.534,103.024 81.859,102.699 85.964,102.699 93.032,95.631 H18.11@97.536,95.631
SERVER_GPIO4: H18.9 U13.26 | length 15.1
  Top Layer w0.25: U13.26@84.569,105.844 84.869,105.844 90.002,100.711 H18.9@97.536,100.711
SERVER_GPIO5: H18.6 U13.29 | length 13.5
  Top Layer w0.25: U13.29@84.569,109.654 84.869,109.654 86.192,108.331 H18.6@97.536,108.331
SERVER_GPIO12: H14.11 U8.3 U13.14 | length 57
  Top Layer w0.25: v1(56.515,94.742) 52.451,94.742 H14.11@51.308,95.885 57.307,95.885 60.059,98.637 60.059,98.767 60.192,98.9 61.095,98.9 66.769,104.574 U13.14@67.069,104.574 ; v1(56.896,90.297) 56.959,90.233 56.959,81.852 57.023,81.788 68.326,81.788 71.516,78.598 U8.3@71.516,75.709
  Bottom Layer w0.25: v1(56.515,94.742) 56.515,94.62 56.896,94.239 v1(56.896,90.297)
SERVER_GPIO13: H14.12 U8.2 U13.16 | length 58.3
  Top Layer w0.25: v1(52.197,89.154) 52.197,92.312 51.308,93.201 H14.12@51.308,93.345 60.988,93.345 62.481,94.838 62.481,97.689 64.986,100.194 68.544,100.194 71.374,103.024 U13.16@71.374,103.324 ; v1(58.039,82.677) 68.326,82.677 72.166,78.837 U8.2@72.166,75.709
  Bottom Layer w0.25: v1(52.197,89.154) 52.283,89.068 52.283,88.433 v1(58.039,82.677)
SERVER_GPIO14: H14.10 U8.4 U13.13 | length 58.5
  Top Layer w0.25: v1(55.499,97.155) 52.578,97.155 H14.10@51.308,98.425 59.35,98.425 59.708,98.783 59.708,98.912 60.047,99.251 60.176,99.251 66.769,105.844 U13.13@67.069,105.844 ; v1(55.626,86.868) 56.261,86.233 56.261,80.899 68.326,80.899 70.866,78.359 U8.4@70.866,75.709
  Bottom Layer w0.25: v1(55.499,97.155) 55.562,97.091 55.562,86.931 v1(55.626,86.868)
SERVER_GPIO15: H18.12 U8.5 U13.23 | length 59.8
  Top Layer w0.25: v1(68.58,79.121) 70.216,77.485 U8.5@70.216,75.709 ; v1(78.994,101.727) 78.994,101.754 U13.23@80.264,103.024 ; U13.23@80.264,103.324 U13.23@80.264,103.024 ; H18.12@97.536,93.091 93.543,93.091 87.862,98.773 84.515,98.773 U13.23@80.264,103.024
  Bottom Layer w0.25: v1(68.58,79.121) 68.58,84.455 66.929,86.106 66.929,96.393 72.263,101.727 v1(78.994,101.727)
SERVER_GPIO16: H18.8 R54.1 U13.27 | length 116.2
  Top Layer w0.25: R54.1@16.649,51.816 v2(16.649,53.963) ; v2(40.894,65.786) 47.879,72.771 54.102,72.771 54.483,73.152 54.483,89.281 57.531,92.329 v1(61.214,92.329) ; v1(81.026,107.188) 84.495,107.188 U13.27@84.569,107.114 84.869,107.114 88.732,103.251 H18.8@97.536,103.251
  Bottom Layer w0.25: v2(16.649,53.963) 28.472,65.786 v2(40.894,65.786) ; v1(61.214,92.329) 76.073,107.188 v1(81.026,107.188)
SERVER_GPIO17: H18.7 U13.28 | length 14
  Top Layer w0.25: U13.28@84.569,108.384 84.869,108.384 87.462,105.791 H18.7@97.536,105.791
SERVER_GPIO18: H18.5 U13.30 | length 13
  Top Layer w0.25: U13.30@84.569,110.924 84.622,110.871 H18.5@97.536,110.871
SERVER_GPIO19: H18.4 U13.31 | length 13.5
  Top Layer w0.25: U13.31@84.569,112.194 84.869,112.194 86.086,113.411 H18.4@97.536,113.411
SERVER_GPIO21: H18.3 U13.33 | length 13.5
  Top Layer w0.25: U13.33@84.569,114.734 84.869,114.734 86.086,115.951 H18.3@97.536,115.951
SERVER_GPIO22: H18.2 U13.36 | length 13
  Top Layer w0.25: U13.36@84.569,118.544 84.622,118.491 H18.2@97.536,118.491
SERVER_GPIO23: H18.1 U13.37 | length 13.5
  Top Layer w0.25: U13.37@84.569,119.814 84.869,119.814 86.086,121.031 H18.1@97.536,121.031
SERVER_GPIO25: H14.7 U13.10 | length 17.3
  Top Layer w0.25: H14.7@51.308,106.045 63.16,106.045 66.769,109.654 U13.10@67.069,109.654
SERVER_GPIO26: H14.8 U13.11 | length 17.8
  Top Layer w0.25: H14.8@51.308,103.505 61.89,103.505 66.769,108.384 U13.11@67.069,108.384
SERVER_GPIO27: H14.9 U13.12 | length 18.3
  Top Layer w0.25: H14.9@51.308,100.965 60.62,100.965 66.769,107.114 U13.12@67.069,107.114
SERVER_GPIO32: H14.5 R75.1 U13.8 | length 84.6
  Top Layer w0.25: R75.1@30.341,52.832 30.341,52.882 48.768,71.309 v1(48.768,71.501) ; v1(48.895,111.125) H14.5@51.308,111.125 65.7,111.125 66.769,112.194 U13.8@67.069,112.194
  Bottom Layer w0.25: v1(48.768,71.501) 48.831,71.564 48.831,111.061 v1(48.895,111.125)
SERVER_GPIO33: H14.6 R68.1 U13.9 | length 87.7
  Top Layer w0.25: R68.1@30.468,48.895 32.385,48.895 33.528,50.038 33.528,54.737 v1(50.292,71.501) ; v1(49.657,108.585) H14.6@51.308,108.585 64.43,108.585 66.769,110.924 U13.9@67.069,110.924
  Bottom Layer w0.25: v1(49.657,108.585) 49.657,89.916 50.292,89.281 v1(50.292,71.501)
SERVER_GPIO34: H14.3 U13.6 | length 16.4
  Top Layer w0.25: H14.3@51.308,116.205 52.779,114.734 U13.6@67.069,114.734
SERVER_GPIO35: H14.4 U13.7 | length 15.8
  Top Layer w0.25: H14.4@51.308,113.665 66.868,113.665 U13.7@67.069,113.464
SERVER_GPIO36: H14.1 U13.4 | length 17.4
  Top Layer w0.25: H14.1@51.308,121.285 56.261,121.285 60.071,117.475 66.868,117.475 U13.4@67.069,117.274
SERVER_GPIO39: H14.2 U13.5 | length 16.9
  Top Layer w0.25: H14.2@51.308,118.745 57.868,118.745 60.284,116.329 66.744,116.329 U13.5@67.069,116.004
SERVER_IO0_AUTO: D21.1 Q8.3 | length 4
  Top Layer w0.25: Q8.3@80.248,96.901 82.223,96.901 83.493,98.171 D21.1@83.693,98.171
SERVER_IO0_KEY: D20.1 H23.2 SW4.3 SW4.4 | length 14.4
  Top Layer w0.25: SW4.4@77.379,89.213 SW4.3@81.879,89.213 85.657,89.213 H23.2@86.614,90.17 86.614,94.492 86.864,94.742 D20.1@86.967,94.742
SERVER_RTS: IC3.11 Q7.2 R69.1 | length 92.5
  Top Layer w0.2: IC3.11@131.985,66.853 132.31,66.853 132.408,66.951 132.529,66.951 133.985,68.408 137.623,68.408 v2(137.668,68.453)
  Top Layer w0.25: Q7.2@70.723,97.988 Q7.2@71.073,97.988 ; v1(72.898,97.028) 71.938,97.988 Q7.2@71.073,97.988 ; R69.1@73.418,100.457 73.093,100.132 73.093,100.008 Q7.2@71.073,97.988
  Bottom Layer w0.25: v1(72.898,97.028) 87.376,97.028 87.884,96.52 87.884,93.345 90.678,90.551 96.647,90.551 108.077,79.121 129.794,79.121 137.668,71.247 v2(137.668,68.453)
SERVER_RXD: IC3.7 R106.1 | length 51.2
  Top Layer w0.2: IC3.7@131.985,65.253 132.944,65.253 v2(133.096,65.405)
  Top Layer w0.25: R106.1@91.44,81.661 91.44,78.867 104.902,65.405 v1(116.586,65.405)
  Bottom Layer w0.2: v1(116.586,65.405) v2(133.096,65.405)
SERVER_TXD: IC3.6 R105.1 | length 51.1
  Top Layer w0.2: IC3.6@131.985,64.853 132.886,64.853 v2(133.096,64.643)
  Top Layer w0.25: R105.1@93.091,81.661 93.091,78.867 105.283,66.675 117.475,66.675 v1(117.475,64.643)
  Bottom Layer w0.2: v1(117.475,64.643) v2(133.096,64.643)
SERVER_U0RXD: R105.2 U13.34 | length 42.5
  Top Layer w0.25: U13.34@84.569,116.004 84.894,116.329 85.595,116.329 85.852,116.586 90.297,116.586 90.805,117.094 v1(91.567,117.094) ; v1(91.44,92.71) 93.091,91.059 R105.2@93.091,82.761
  Bottom Layer w0.25: v1(91.44,92.71) 91.504,92.773 91.504,117.03 v1(91.567,117.094)
SERVER_U0TXD: R106.2 U13.35 | length 40.6
  Top Layer w0.25: U13.35@84.569,117.274 84.77,117.475 v1(89.535,117.475) ; v1(89.789,92.456) 91.44,90.805 R106.2@91.44,82.761
  Bottom Layer w0.25: v1(89.535,117.475) 89.535,117.353 89.789,117.099 v1(89.789,92.456)
USB_N: CN1.A7 CN1.B7 D9.2 IC3.58 | length 72.2
  Top Layer w0.102: v2(110.541,4.007) 110.49,3.956 110.49,3.802 110.706,3.586 CN1.B7@110.706,3.321 ; v5(111.346,7.112) 111.346,7.115 111.658,7.426 111.658,14.205 111.599,14.265 110.689,14.265 110.49,14.464 D9.2@110.49,14.764 110.49,15.064 110.689,15.263 111.599,15.263 111.658,15.323 111.658,16.471 111.626,16.503 111.626,17.593 111.314,17.904 v1(111.314,17.907) 111.314,18.815 112.057,19.558 114.3,19.558 114.935,20.193 114.935,32.131 121.285,38.481 121.285,55.257 127.235,61.207 IC3.58@127.235,62.103 ; CN1.A7@111.456,4.606 CN1.A7@111.456,4.921 111.456,5.236 112.035,5.815 112.035,6.212 v1(112.141,6.317)
  Bottom Layer w0.102: v2(110.541,4.007) 111.252,4.718 111.252,5.428 v1(112.141,6.317) v5(111.346,7.112) ; v1(111.314,17.907) v1@111.399,17.822
USB_P: CN1.A6 CN1.B6 D8.2 IC3.59 | length 70.8
  Top Layer w0.102: CN1.A6@110.956,4.921 110.956,5.897 111.379,6.32 ; CN1.B6@111.206,3.321 111.206,4.39 111.169,4.428 111.169,5.759 111.379,5.969 111.379,6.32 ; IC3.59@127.635,62.103 127.635,61.305 121.488,55.159 121.488,38.397 115.138,32.047 115.138,20.109 114.384,19.355 112.141,19.355 v1(112.141,17.907) 112.141,17.904 111.829,17.593 111.829,16.587 111.862,16.555 111.862,15.323 111.921,15.263 112.831,15.263 113.03,15.064 D8.2@113.03,14.764 113.03,14.464 112.831,14.265 111.921,14.265 111.862,14.205 111.862,7.426 112.174,7.115 111.394,6.335 111.379,6.32
USB_VBUS: D6.1 R44.2 | length 3.5
  Top Layer w0.5: D6.1@123.698,44.99 R44.2@123.698,48.514
VREGOUT_NET: C36.1 C61.1 C62.1 C63.1 C64.1 IC3.8 IC3.25 IC3.31 IC3.44 IC3.66 | length 40.7
  Top Layer w0.2: C64.1@121.364,66.167 121.364,66.157 121.564,65.957 121.574,65.957 121.878,65.653 IC3.44@124.085,65.653 124.708,65.653 125.658,66.603 125.658,68.862 126.035,68.862 ; C36.1@123.063,72.311 123.073,72.311 123.883,71.501 125.349,71.501 126.035,70.815 IC3.31@126.035,70.003 126.035,68.862 ; C61.1@132.08,59.436 132.07,59.436 130.435,61.071 IC3.66@130.435,62.103 130.435,65.536 130.552,65.653 ; C62.1@134.62,65.659 133.604,65.659 133.395,65.868 132.904,65.868 132.69,65.653 IC3.8@131.985,65.653 130.552,65.653 ; C63.1@134.747,71.422 134.741,71.428 133.677,71.428 133.669,71.419 133.285,71.419 133.277,71.428 130.14,71.428 130.113,71.456 128.579,71.456 128.435,71.311 IC3.25@128.435,70.003 128.435,68.862 ; 126.035,68.862 128.435,68.862 ; 128.435,68.862 128.463,68.834 130.302,68.834 130.552,68.584 130.552,65.653
pads on no net: CN1.A2 CN1.A3 CN1.A8 CN1.A10 CN1.A11 CN1.B2 CN1.B3 CN1.B8 CN1.B10 CN1.B11 CN1.H1 CN1.H2 H11.3 H15.3 IC3.5 IC3.12 IC3.14 IC3.15 IC3.16 IC3.20 IC3.22 IC3.23 IC3.24 IC3.32 IC3.33 IC3.37 IC3.40 IC3.41 IC3.42 IC3.43 IC3.45 IC3.46 IC3.47 IC3.48 IC3.49 IC3.50 IC3.52 IC3.53 IC3.54 IC3.55 IC3.56 IC3.62 IC3.63 IC3.64 IC3.65 IC3.67 IC3.69 U3.17 U3.18 U3.19 U3.20 U3.21 U3.22 U3.32 U6.15 U7.17 U7.18 U7.19 U7.20 U7.21 U7.22 U7.32 U8.6 U8.9 U9.6 U9.7 U9.9 U9.15 U10.1 U10.2 U10.3 U10.4 U10.11 U13.17 U13.18 U13.19 U13.20 U13.21 U13.22 U13.32

## Polygon pours and split planes (outlines as drawn)
GND on GND "NONET_L02_P001" (solid, shelved, pour order 1): -2.667,126.365 -2.413,126.619 148.336,126.619 148.336,-2.54 -2.921,-2.54 -2.921,4.318 -2.667,9.017 -2.667,13.208 -2.667,126.492 -2.794,126.619
+12.0 on Bottom Layer "NONET_L04_P003" (solid, shelved, pour order 3): 135.763,45.974 135.89,46.101 149.098,46.101 149.098,-3.175 131.699,-3.175 131.699,28.829 130.048,30.48 128.905,30.48 128.905,33.02 129.667,33.782 133.731,33.782 133.731,44.069 135.763,46.101
+12.0 on Top Layer "NONET_L01_P007" (solid, shelved, pour order 7): 129.286,31.496 129.286,22.733 130.429,22.733 132.588,20.574 132.588,18.796 148.717,18.796 148.59,18.923 148.59,27.305 143.129,27.305 143.129,33.528 136.525,33.528 134.493,31.496
+12.0 on Top Layer "NONET_L01_P006" (solid, shelved, pour order 6): 129.286,33.274 133.604,33.274 135.255,34.925 135.255,35.052 143.129,35.052 143.129,33.528 136.525,33.528 134.493,31.496 129.286,31.496
+12.0 on Top Layer "NONET_L01_P005" (solid, shelved, pour order 5): 148.59,51.181 148.59,27.305 143.129,27.305 143.129,51.181
NetF1_1 on Top Layer "NONET_L01_P004" (solid, shelved, pour order 4): 121.627,14.26 121.79,14.097 130.302,14.097 139.954,4.445 139.954,-2.921 135.89,-2.921 135.763,-2.794 135.763,-0.381 127.381,8.001 121.666,8.001 121.666,14.097
3V3 on 3V3 "NONET_L03_P002" (solid, shelved, pour order 2): -2.794,126.619 -2.667,126.746 148.463,126.746 148.463,-2.667 148.209,-2.413 -3.048,-2.413

## Keep-outs
Top Layer:
  region: 17.145,126.746 17.272,126.619 35.941,126.619 35.941,121.158 17.145,121.158
Keep-Out Layer:
  region: 115.57,127.635 134.493,127.635 134.493,121.92 134.366,121.793 115.824,121.793
  region: 66.294,127.508 85.217,127.508 85.217,121.793 85.09,121.666 66.548,121.666
  region: 17.272,126.873 36.195,126.873 36.195,121.158 36.068,121.031 17.526,121.031

## Other copper
Top Layer:
  drawing of 22 lines, arcs and shapes, not listed
  text "Server ESP32" at 86.614,122.682 h1.32
  text "Access Point ESP32" at 135.763,120.142 h1.32
  text "Client ESP32" at 16.637,98.806 h1.32
  text "Cyber-ICS-TestBed / 09-29-2026" at -1.651,69.088 h1.52
  text "Martin Korir" at -1.524,67.691 h0.72

## Silkscreen, mask and mechanical layers (free items; w line width, h text height)
Top Overlay:
  lines w0.254: 100.203,120.904 100.203,123.19
Mechanical 1:
  lines w0.254: -3.405,-3.35 -3.405,126.933 -3.338,127.001 149.338,127.001 ; -3.302,-3.429 149.307,-3.429 149.339,-3.46 149.339,127.001 ; 149.338,127.001 149.339,127.001

## Text inside footprints (layer, text, board x,y; h text height)
CN1: Top 3D Body "Board Edge" at 109.981,-3.079 h0.5